# Altium PCB IC Power SimCom.PcbDoc (part 3 of 3)
Units mm, origin at the board's own origin, x right, y up, seen from the top; angles counter-clockwise.
Board outline 110 x 110 mm, 2 copper layers (Top Layer, Bottom Layer); 161 components, 109 nets, 599 pads, 845 vias.
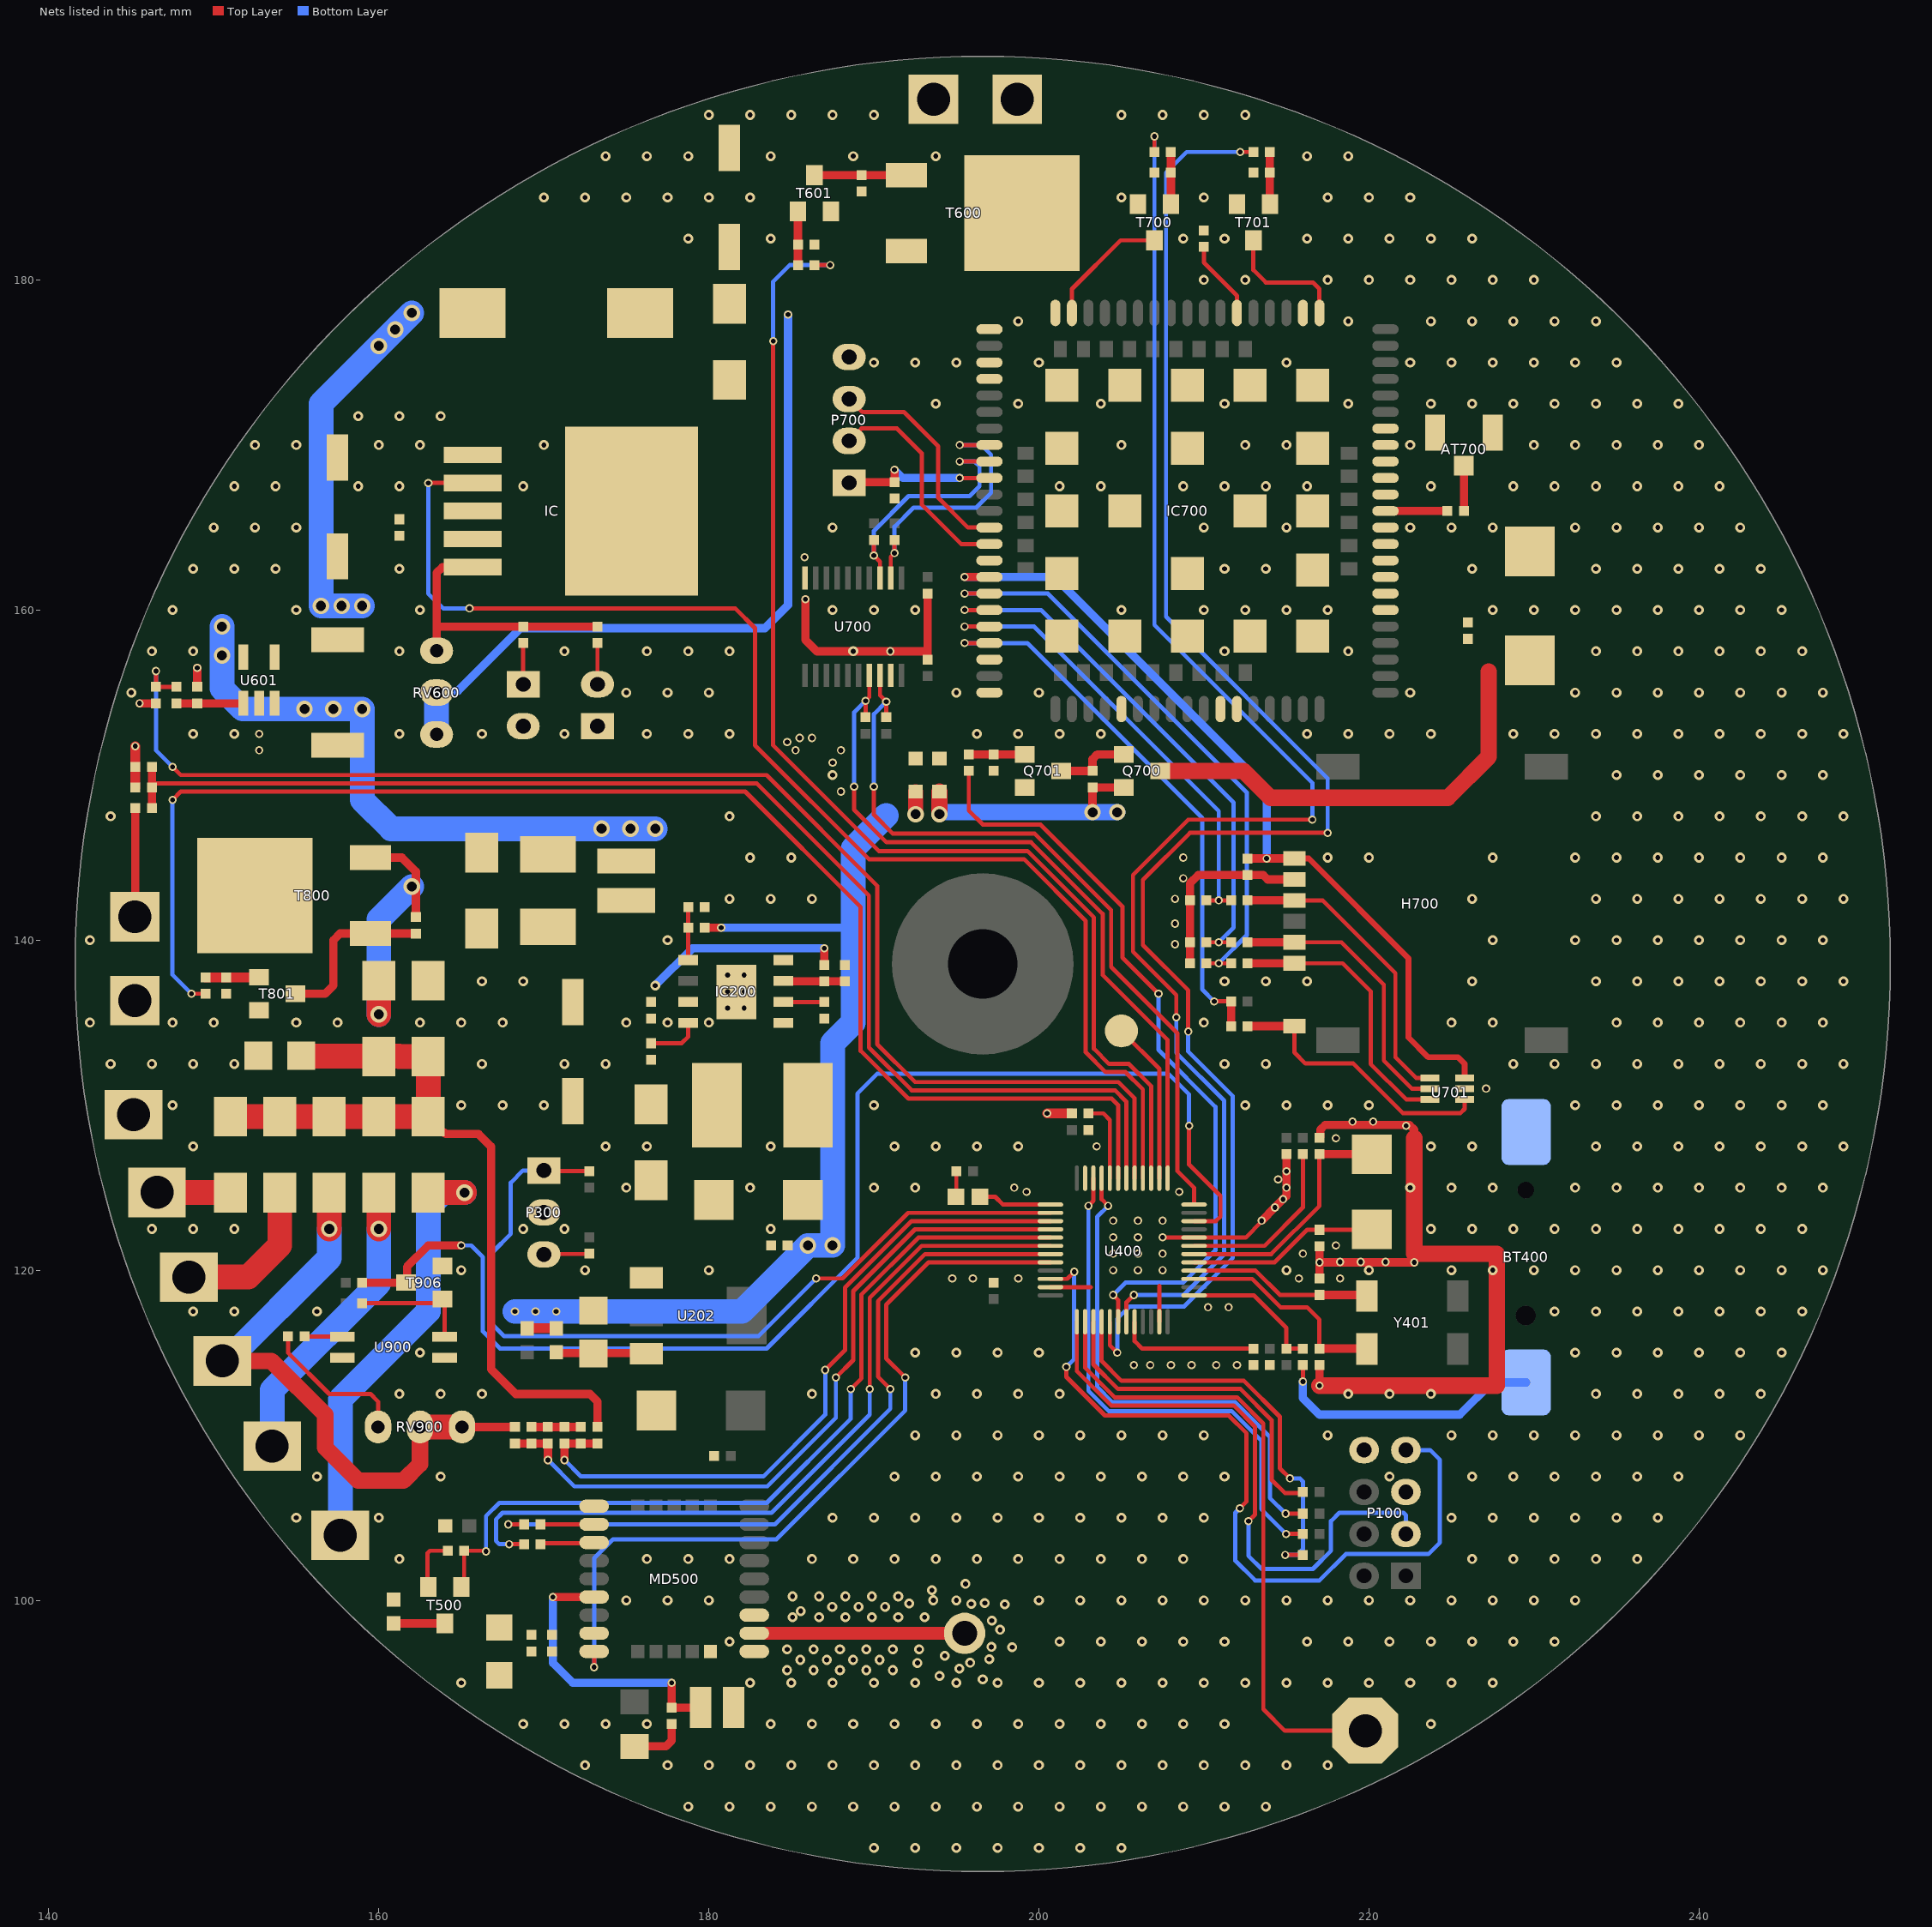
[diagram p2: the nets of this part, all layers, seen from the top]

## Via types
v1: diameter 0.6, hole 0.3, Top Layer to Bottom Layer, tented both sides, 654 vias
v2: diameter 0.5, hole 0.3, Top Layer to Bottom Layer, tented both sides, 164 vias
v3: diameter 1, hole 0.6, Top Layer to Bottom Layer, tented both sides, 27 vias

## Nets (pads, with @x,y where several pads share a name; then routed paths per layer and width w, separated by ;. In a path a pad name is that pad's centre, name@x,y a point inside that pad or via, vN(x,y) a via of type N, cw(c..) or ccw(c..) an arc to the next point about the centre after c; other vN are vias at no path point) (continued)
GND: BT400.2 C201.1 C202.1 C203.2 C204.2 C205.1 C208.1 C209.2 C400.1 C401.1 C402.1 C403.1 C404.1 C405.1 C406.1 C407.1 C500.1 C501.1 C502.2 C600.2 C601.1 C602.2 C603.1 C801.1 C802.2 C803.1 C900.1 C.2 D200.1 IC200.8 IC200.9 IC.1 L701.1 MD500.1 MD500.10 MD500.12 MD500.28 P100.5 P100.8 P300.2 P600.2 P601.1 P602.2 P800.2 R201.1 R203.1 R204.1 R400.1 R405.1 R605.1 R607.1 R803.1 R804.1 R806.1 R901.1 T601.2 T801.2 T905.1 T906.2 U202.1 U400.8 U400.23 U400.35 U400.47 U601.2 U900.2 U900.3 | length 72.1
  Top Layer w0.254: U400.35@200.7,118.975 203.15,118.975 ; U400.47@207.3,116.875 207.3,119.05 ; v2@207.4,121.975 U400.8@209.4,121.975 212.525,121.975 v2@213.5,122.95
  Top Layer w0.5: v2(145.5,154.35) C603.1@146.5,154.35 ; R607.1@149,155.35 v2(149,156.5) ; C900.1@169.25,110.5 C801.1@172.25,110.5 ; v2(213.5,123) v2(214.3,123.8) 215,124.5 v2(215,125) C402.1@215,127.025 ; v2(217,113) C403.1@217,114.25 ; C404.1@217,119.5 v2(217,120.475) ; C401.1@217,121.45 v2(217,120.475) ; C400.1@217,128.025 217.05,128.075 217.05,128.507 217.343,128.8 222.457,128.8 222.75,128.507 222.75,128 ; 222.75,121 v2(222.75,120.475) v2(217,120.475)
  Top Layer w0.6: R804.1@145.25,149.25 C803.1@145.25,150.5 v2(145.25,151.75) ; v2(200.5,129.5) R405.1@202,129.5
  Top Layer w1: v2(217,113) 227.75,113 227.75,121 222.75,121 222.75,128
  other v1: 190,85 192.5,85 195,85 197.5,85 200,85 202.5,85 205,85 178.75,87.5 181.25,87.5 183.75,87.5 186.25,87.5 188.75,87.5 191.25,87.5 193.75,87.5 196.25,87.5 198.75,87.5 201.25,87.5 203.75,87.5 206.25,87.5 208.75,87.5 211.25,87.5 213.75,87.5 172.5,90 177.5,90 180,90 182.5,90 185,90 187.5,90 190,90 192.5,90 195,90 197.5,90 200,90 202.5,90 205,90 207.5,90 210,90 212.5,90 215,90 217.5,90 168.75,92.5 171.25,92.5 173.75,92.5 176.25,92.5 183.75,92.5 186.25,92.5 188.75,92.5 191.25,92.5 193.75,92.5 196.25,92.5 198.75,92.5 201.25,92.5 203.75,92.5 206.25,92.5 208.75,92.5 211.25,92.5 223.75,92.5 165,95 182.5,95 185,95 187.5,95 190,95 192.5,95 195,95 197.5,95 200,95 202.5,95 205,95 207.5,95 210,95 212.5,95 215,95 217.5,95 220,95 222.5,95 225,95 227.5,95 196.596,95.204 193.976,95.416 184.745,95.766 186.345,95.766 187.945,95.766 189.545,95.766 191.145,95.766 195.178,95.861 192.64,96.204 195.84,96.214 185.545,96.39 187.145,96.39 188.745,96.39 190.345,96.39 196.991,96.433 194.297,96.636 184.745,97.027 186.345,97.027 187.945,97.027 189.545,97.027 191.145,97.027 192.745,97.027 198.383,97.154 197.122,97.172 181.25,97.5 201.25,97.5 203.75,97.5 206.25,97.5 208.75,97.5 211.25,97.5 216.25,97.5 218.75,97.5 221.25,97.5 223.75,97.5 226.25,97.5 228.75,97.5 231.25,97.5 197.652,98.216 197.145,98.772 185.078,98.973 186.678,98.973 188.278,98.973 189.878,98.973 191.478,98.973 193.078,98.973 185.564,99.345 187.478,99.61 189.078,99.61 190.678,99.61 197.937,99.753 195.9,99.778 192.14,99.806 196.724,99.837 175,100 177.5,100 180,100 193.601,100.001 195,100 200,100 202.5,100 205,100 207.5,100 210,100 212.5,100 215,100 217.5,100 220,100 222.5,100 225,100 227.5,100 230,100 232.5,100 185.078,100.234 186.678,100.234 188.278,100.234 189.878,100.234 191.478,100.234 193.516,100.613 195.554,100.991 161.25,102.5 176.25,102.5 178.75,102.5 181.25,102.5 186.25,102.5 188.75,102.5 191.25,102.5 193.75,102.5 196.25,102.5 198.75,102.5 201.25,102.5 203.75,102.5 206.25,102.5 208.75,102.5 226.25,102.5 228.75,102.5 231.25,102.5 233.75,102.5 236.25,102.5 155,105 160,105 187.5,105 190,105 192.5,105 195,105 197.5,105 200,105 202.5,105 205,105 207.5,105 210,105 225,105 227.5,105 230,105 232.5,105 235,105 237.5,105 156.25,107.5 163.75,107.5 191.25,107.5 193.75,107.5 196.25,107.5 198.75,107.5 201.25,107.5 203.75,107.5 206.25,107.5 208.75,107.5 211.25,107.5 221.25,107.5 226.25,107.5 228.75,107.5 231.25,107.5 233.75,107.5 236.25,107.5 238.75,107.5 192.5,110 195,110 197.5,110 200,110 202.5,110 205,110 207.5,110 210,110 217.5,110 225,110 227.5,110 230,110 232.5,110 235,110 237.5,110 240,110 242.5,110 161.25,112.5 163.75,112.5 166.25,112.5 186.25,112.5 193.75,112.5 196.25,112.5 198.75,112.5 201.25,112.5 218.75,112.5 221.25,112.5 223.75,112.5 233.75,112.5 236.25,112.5 238.75,112.5 241.25,112.5 243.75,112.5 162.5,115 192.5,115 195,115 197.5,115 200,115 232.5,115 235,115 237.5,115 240,115 242.5,115 245,115 148.75,117.5 151.25,117.5 156.25,117.5 231.25,117.5 233.75,117.5 236.25,117.5 238.75,117.5 241.25,117.5 243.75,117.5 246.25,117.5 165,120 172.5,120 180,120 215,120 220,120 225,120 227.5,120 230,120 232.5,120 235,120 237.5,120 240,120 242.5,120 245,120 247.5,120 146.25,122.5 148.75,122.5 151.25,122.5 168.75,122.5 171.25,122.5 183.75,122.5 223.75,122.5 226.25,122.5 228.75,122.5 231.25,122.5 233.75,122.5 236.25,122.5 238.75,122.5 241.25,122.5 243.75,122.5 246.25,122.5 175,125 182.5,125 190,125 192.5,125 222.5,125 225,125 227.5,125 232.5,125 235,125 237.5,125 240,125 242.5,125 245,125 247.5,125 148.75,127.5 173.75,127.5 176.25,127.5 183.75,127.5 191.25,127.5 193.75,127.5 196.25,127.5 198.75,127.5 223.75,127.5 226.25,127.5 233.75,127.5 236.25,127.5 238.75,127.5 241.25,127.5 243.75,127.5 246.25,127.5 248.75,127.5 147.5,130 165,130 167.5,130 170,130 190,130 143.75,132.5 146.25,132.5 148.75,132.5 151.25,132.5 166.25,132.5 171.25,132.5 173.75,132.5 142.5,135 147.5,135 150,135 155,135 157.5,135 162.5,135 165,135 167.5,135 175,135 177.5,135 180,135 166.25,137.5 168.75,137.5 142.5,140 177.5,140 181.25,142.5 183.75,142.5 186.25,142.5 182.5,145 185,145 143.75,147.5 181.25,147.5 187.5,150 148.75,152.5 151.25,152.5 161.25,152.5 166.25,152.5 171.25,152.5 176.25,152.5 178.75,152.5 181.25,152.5 145,155 175,155 177.5,155 180,155 146.25,157.5 148.75,157.5 161.25,157.5 171.25,157.5 176.25,157.5 178.75,157.5 181.25,157.5 147.5,160 155,160 162.5,160 148.75,162.5 151.25,162.5 153.75,162.5 161.25,162.5 150,165 152.5,165 155,165 151.25,167.5 153.75,167.5 158.75,167.5 161.25,167.5 168.75,167.5 152.5,170 155,170 160,170 162.5,170 170,170 158.75,171.75 161.25,171.75 163.75,171.75 178.75,182.5 183.75,182.5 170,185 172.5,185 175,185 177.5,185 180,185 182.5,185 173.75,187.5 176.25,187.5 178.75,187.5 183.75,187.5 188.75,187.5 193.75,187.5 180,190 182.5,190 185,190 187.5,190 190,190
  other v2: 205.75,114.25 206.75,114.25 208,114.25 209.25,114.25 210.75,114.25 212,114.25 210.25,117.75 211.5,117.75 194.75,119.5 196,119.5 198.75,119.5 215.75,119.5 218.25,119.5 204.5,120 206,120 207.5,120 218.25,120.5 219.5,120.5 221,120.5 204.5,121 206,121 207.5,121 216,121 218,121.5 204.5,122 206,122 207.5,122 204.5,123 206,123 207.5,123 214.8,124.3 199.25,124.75 208.5,124.75 198.5,125 214.5,125.5 215,126 203.5,127.5 218,128 222.25,128.75 219,129 220.25,129 181.133,135.885 182.133,135.885 181.133,136.885 182.133,136.885 181.133,137.885 182.133,137.885 188,149 187.5,150.75 152.75,151.5 185.25,151.5 188,151.5 184.75,152 185.5,152.25 186.25,152.25 152.75,152.5
GPS_PWR: L501.1 L502.2 R503.2 T500.2 | length 3.2
  Top Layer w0.254: T500.2@163,100.8 162.95,100.85 162.95,102.851 163.099,103 R503.2@164,103
GPS_VCC: C500.2 C501.2 C502.1 L501.2 MD500.8 T500.3 | length 3.1
  Top Layer w0.5: L501.2@160.9,98.6 T500.3@164,98.6
GSM.GND: AT700.2 C701.2 C702.2 C703.1 C704.1 C705.1 C706.1 C707.1 C708.1 C709.1 H700.5 IC700.2 IC700.17 IC700.18 IC700.29 IC700.39 IC700.45 IC700.46 IC700.54 IC700.58 IC700.59 IC700.61 IC700.62 IC700.63 IC700.64 IC700.65 IC700.69 IC700.70 IC700.71 IC700.72 IC700.73 IC700.74 IC700.75 IC700.76 IC700.77 IC700.78 IC700.79 IC700.80 IC700.81 IC700.82 IC700.83 IC700.84 IC700.85 IC700.86 IC700.87 IC700.88 IC700.89 IC700.91 IC700.92 IC700.94 L701.2 P700.4 Q701.2 R700.1 R707.2 R709.2 R711.2 T700.2 T701.2 U700.10 U700.19 U701.2 | length 25.7
  Top Layer w0.5: v2(185.85,160.65) 185.85,158.2 186.55,157.5 v2(191,157.5) 193.2,157.5 193.25,157.55 ; C705.1@193.25,157 193.25,157.55 ; C704.1@193.25,161 193.25,157.55 ; C709.1@209.15,138.597 C707.1@209.15,142.407 209.15,143.43 209.667,143.947 C706.1@212.65,143.947 213.591,143.947 213.861,143.677 H700.5@215.482,143.677
  other v1: 212.5,130 215,130 217.5,130 220,130 232.5,130 235,130 237.5,130 240,130 242.5,130 245,130 247.5,130 211.25,132.5 213.75,132.5 228.75,132.5 231.25,132.5 233.75,132.5 236.25,132.5 238.75,132.5 241.25,132.5 243.75,132.5 246.25,132.5 248.75,132.5 210,135 225,135 227.5,135 235,135 237.5,135 240,135 242.5,135 245,135 247.5,135 211.25,137.5 213.75,137.5 216.25,137.5 226.25,137.5 233.75,137.5 236.25,137.5 238.75,137.5 241.25,137.5 243.75,137.5 246.25,137.5 248.75,137.5 227.5,140 232.5,140 235,140 237.5,140 240,140 242.5,140 245,140 247.5,140 226.25,142.5 233.75,142.5 236.25,142.5 238.75,142.5 241.25,142.5 243.75,142.5 246.25,142.5 248.75,142.5 217.5,145 220,145 227.5,145 232.5,145 235,145 237.5,145 240,145 242.5,145 245,145 247.5,145 233.75,147.5 236.25,147.5 238.75,147.5 241.25,147.5 243.75,147.5 246.25,147.5 248.75,147.5 235,150 237.5,150 240,150 242.5,150 245,150 247.5,150 196.25,152.5 198.75,152.5 201.25,152.5 203.75,152.5 216.25,152.5 218.75,152.5 221.25,152.5 223.75,152.5 228.75,152.5 231.25,152.5 233.75,152.5 236.25,152.5 238.75,152.5 241.25,152.5 243.75,152.5 246.25,152.5 248.75,152.5 195,155 200,155 222.5,155 232.5,155 235,155 237.5,155 240,155 242.5,155 245,155 247.5,155 188.75,157.5 211.25,157.5 218.75,157.5 233.75,157.5 236.25,157.5 238.75,157.5 241.25,157.5 243.75,157.5 246.25,157.5 187.5,160 190,160 192.5,160 205,160 210,160 212.5,160 215,160 217.5,160 227.5,160 230,160 232.5,160 235,160 237.5,160 240,160 242.5,160 245,160 211.25,162.5 213.75,162.5 226.25,162.5 233.75,162.5 236.25,162.5 238.75,162.5 241.25,162.5 243.75,162.5 187.5,165 210,165 215,165 222.5,165 225,165 227.5,165 232.5,165 235,165 237.5,165 240,165 242.5,165 201.25,167.5 203.75,167.5 208.75,167.5 211.25,167.5 213.75,167.5 216.25,167.5 223.75,167.5 228.75,167.5 231.25,167.5 233.75,167.5 236.25,167.5 238.75,167.5 241.25,167.5 205,170 212.5,170 215,170 222.5,170 230,170 232.5,170 235,170 237.5,170 240,170 193.75,172.5 198.75,172.5 203.75,172.5 211.25,172.5 218.75,172.5 223.75,172.5 226.25,172.5 228.75,172.5 231.25,172.5 233.75,172.5 236.25,172.5 238.75,172.5 190,175 192.5,175 195,175 200,175 215,175 222.5,175 225,175 227.5,175 230,175 232.5,175 235,175 198.75,177.5 218.75,177.5 223.75,177.5 226.25,177.5 228.75,177.5 231.25,177.5 233.75,177.5 210,180 212.5,180 217.5,180 220,180 222.5,180 225,180 227.5,180 230,180 208.75,182.5 211.25,182.5 216.25,182.5 218.75,182.5 221.25,182.5 223.75,182.5 226.25,182.5 205,185 210,185 217.5,185 220,185 222.5,185 216.25,187.5 218.75,187.5 205,190 207.5,190 210,190 212.5,190
  other v2: 227.1,131 208.25,139.75 208.25,141 208.25,142.5 208.75,143.75 208.75,145 185.8,163.2
GSM.PWR: L700.2 Q700.2 R705.1 | length 15.4
  Top Layer w0.5: v3@203.25,148 R705.1@203.25,149.25 Q700.2@205.15,149.25
  Top Layer w1: v3(193.973,147.627) L700.2@193.973,149
  Bottom Layer w1: v3(193.973,147.627) 194.096,147.75 v3(204.75,147.75)
  other v3: 203.25,147.75
GSM.PWRKEY: IC700.1 T701.3 | length 7.7
  Top Layer w0.254: T701.3@213,182.4 213,180.6 213.75,179.85 216.6,179.85 217,179.45 IC700.1@217,178
GSM.RESET: IC700.16 T700.3 | length 7.7
  Top Layer w0.254: IC700.16@202,178 202,179.45 204.95,182.4 T700.3@207,182.4
GSM.VBAT: C702.1 C703.2 IC700.55 IC700.56 IC700.57 Q700.3 | length 26.8
  Top Layer w1: Q700.3@207.35,150.25 212.4,150.25 214.025,148.625 224.775,148.625 227.25,151.1 227.25,156.275
LED: D400.2 U400.25 | length 4.5
  Top Layer w0.254: D400.2@196.425,124.45 197.35,124.45 197.825,123.975 U400.25@200.7,123.975
LED_PWR: C600.1 D600.2 R602.2 RV600.2 RV600.3 T600.3 | length 43.6
  Bottom Layer w0.5: RV600.2@163.5,155 163.596,155.096 164.796,155.096 168.6,158.9 183.4,158.9 184.8,160.3 v2(184.8,177.9)
  Bottom Layer w1.5: RV600.3@163.5,152.46 RV600.2@163.5,155
LED_VCC: C601.2 C602.1 IC.4 L601.1 R603.2 U601.4 | length 22.5
  Bottom Layer w1.5: v3(159,160.25) v3(157.75,160.25) v3(156.5,160.25) 156.5,172.5 v3(162,178)
  other v3: 160,176 161,177
NetAT500_1: AT500.1 MD500.11 | length 12.8
  Top Layer w0.8: MD500.11@182.75,98 AT500.1@195.5,98
NetAT700_1: AT700.1 C700.1 | length 2.8
  Top Layer w0.5: C700.1@225.75,166 AT700.1@225.75,168.75
NetC200_1: C200.1 D200.2 IC200.5 L201.1
NetC200_2: C200.2 IC200.4 | length 3.2
  Top Layer w0.254: C200.2@176.5,133.75 178.35,133.75 178.75,134.15 IC200.4@178.75,134.98
NetC201_2: C201.2 L202.2 U202.3 | length 5.5
  Top Layer w0.5: L202.2@170.75,115.027 170.789,114.989 176.163,114.989 U202.3@176.202,114.95
NetC204_1: C204.1 C205.2 IC200.3 L200.2 R200.2 | length 12.2
  Top Layer w0.5: R200.2@187,138.5 v2(187,139.5)
  Bottom Layer w0.5: v1(176.75,137.25) 179,139.5 v2(187,139.5)
NetC503_1: C.1 MD500.6 R502.1 | length 17.4
  Top Layer w0.5: v2(170.55,100.2) MD500.6@173.05,100.2 ; v2(177.75,95) R502.1@177.75,93.5 C.1@179.5,93.5
  Bottom Layer w0.5: v2(170.55,100.2) 170.55,96.2 171.75,95 v2(177.75,95)
NetC603_2: C603.2 R606.2 U400.17 | length 85.5
  Top Layer w0.254: v2(146.5,156.3) C603.2@146.5,155.35 R606.2@147.75,155.35 ; v2(147.5,150.5) 148,150 183.5,150 190.2,143.3 190.2,133.7 192.5,131.4 204.821,131.4 205.8,130.421 U400.17@205.8,125.575
  Bottom Layer w0.254: v2(146.5,156.3) 146.5,151.5 v2(147.5,150.5)
NetC700_2: C700.2 IC700.60 | length 3.7
  Top Layer w0.5: IC700.60@221,166 C700.2@224.75,166
NetC801_2: C801.2 R800.1 R803.2 U400.27 | length 43.1
  Top Layer w0.254: v2(187.052,113.952) 188.25,115.15 188.25,118.943 192.282,122.975 U400.27@200.7,122.975
  Top Layer w0.5: v2(171.25,108.5) R803.2@171.25,109.5 R800.1@173.25,109.5
  Bottom Layer w0.254: v2(171.25,108.5) 172.25,107.5 183.3,107.5 187.052,111.252 v2(187.052,113.952)
NetC803_2: C803.2 R802.1 R804.2 U400.18 | length 79.6
  Top Layer w0.254: R804.2@146.25,149.5 182.9,149.5 189.7,142.7 189.7,133.493 192.293,130.9 204.614,130.9 205.3,130.214 U400.18@205.3,125.575
  Top Layer w0.5: R802.1@146.25,148 146.25,148.5 R804.2@146.25,149.25 146.25,149.5 C803.2@146.25,150.5
NetC900_2: C900.2 R900.1 R901.2 U400.28 | length 44.5
  Top Layer w0.254: v2(187.696,113.496) 188.75,114.55 188.75,118.736 192.489,122.475 U400.28@200.7,122.475
  Top Layer w0.5: R900.1@168.25,109.5 R901.2@170.25,109.5 v2(170.25,108.5)
  Bottom Layer w0.254: v2(170.25,108.5) 171.85,106.9 183.549,106.9 187.696,111.048 v2(187.696,113.496)
NetD400_1: D400.1 R404.2 | length 1.6
  Top Layer w0.254: D400.1@194.975,124.45 195,124.475 R404.2@195,126
NetD500_2: D500.2 R502.2 | length 3.4
  Top Layer w0.5: D500.2@175.5,91.15 177.4,91.15 177.75,91.5 R502.2@177.75,92.5
NetD600_1: D600.1 IC.3 IC.6 L601.2
NetD800_2: D800.2 R801.2 T800.3 | length 16.5
  Top Layer w0.5: T800.3@159.5,145 161.4,145 162.25,144.15 R801.2@162.25,141.4
  Top Layer w1.5: v3(160,135.5) D800.2@160,137.55
  Bottom Layer w1.5: v3(160,135.5) 160,141.25 v3(162,143.25)
NetD900_1: D900.1 T900.1 | length 4.4
  Top Layer w1.5: T900.1@146.558,124.714 146.565,124.707 150.993,124.707 D900.1@151,124.7
NetD902_1: D902.1 T901.1 | length 9.5
  Top Layer w1.5: T901.1@148.488,119.583 152.083,119.583 154,121.5 D902.1@154,124.7
NetD905_1: D905.1 T903.1 | length 18
  Top Layer w1.5: v3(160,122.5) D905.1@160,124.7
  Bottom Layer w1.5: T903.1@153.543,109.347 153.543,112.743 160,119.2 v3(160,122.5)
NetD906_1: D906.1 T904.1 | length 26.9
  Top Layer w1.5: D906.1@163,124.7 v3(165.2,124.7)
  Bottom Layer w1.5: T904.1@157.671,103.937 157.671,112.17 163,117.5 163,123.821 163.879,124.7 v3(165.2,124.7)
NetH700_2: H700.2 R712.2 U701.4 | length 18.5
  Top Layer w0.254: H700.2@215.482,142.407 217.193,142.407 221.6,138 221.6,132.9 222.85,131.65 U701.4@223.7,131.65
  Top Layer w0.5: R712.2@212.65,142.407 H700.2@215.482,142.407
NetH700_3: H700.3 R713.2 U701.5 | length 17.4
  Top Layer w0.254: H700.3@215.482,139.867 218.333,139.867 220.9,137.3 220.9,132.7 222.6,131 U701.5@223.7,131
  Top Layer w0.5: R713.2@212.65,139.867 H700.3@215.482,139.867
NetH700_7: H700.7 R715.2 U701.6 | length 17
  Top Layer w0.254: H700.7@215.482,138.597 218.403,138.597 220.1,136.9 220.1,132.5 222.25,130.35 U701.6@223.7,130.35
  Top Layer w0.5: R715.2@212.65,138.597 H700.7@215.482,138.597
NetH700_8: H700.8 R714.2 U701.1 | length 16.9
  Top Layer w0.254: H700.8@215.482,134.787 215.482,133.193 216.15,132.525 219.05,132.525 222.05,129.525 225.55,129.525 225.8,129.775 U701.1@225.8,130.35
  Top Layer w0.5: R714.2@212.65,134.787 H700.8@215.482,134.787
NetIC200_1: IC200.1 R202.1 R203.2 | length 3.2
  Top Layer w0.254: IC200.1@178.75,138.79 R203.2@178.75,142
NetIC200_6: IC200.6 R204.2 | length 2.5
  Top Layer w0.254: IC200.6@184.517,136.25 R204.2@187,136.25
NetIC200_7: IC200.7 R200.1 R201.2 | length 3.7
  Top Layer w0.5: IC200.7@184.517,137.52 184.527,137.51 188.24,137.51 R201.2@188.25,137.5
NetIC_2: IC.2 U400.16 | length 79.3
  Top Layer w0.254: v2(163,167.7) IC.2@165.685,167.7 ; v2(165.5,160.1) 181.6,160.1 182.8,158.9 182.8,151.8 189.7,144.9 199.1,144.9 202.833,141.167 202.833,134.374 202.833,134.167 202.833,133.21 204.043,132 205.25,132 206.3,130.95 U400.16@206.3,125.575
  Bottom Layer w0.254: v2(163,167.7) 163,161 163.9,160.1 v2(165.5,160.1)
NetIC_5: IC.5 R600.2 R601.2 RV600.1 | length 17.1
  Top Layer w0.5: RV600.1@163.5,157.54 163.5,159 ; IC.5@165.435,162.35 IC.5@165.685,162.6 163.85,162.6 163.5,162.25 163.5,159 ; R600.2@173.25,159 163.5,159
NetMD500_2: MD500.2 R500.1 | length 3.3
  Top Layer w0.254: R500.1@169.8,104.6 MD500.2@173.05,104.6
NetMD500_3: MD500.3 R501.1 | length 3.3
  Top Layer w0.254: R501.1@169.8,103.4 169.85,103.45 173,103.45 MD500.3@173.05,103.5
NetMD500_9: MD500.9 U400.32 | length 48
  Top Layer w0.254: v2(173.05,95.95) MD500.9@173.05,96.9 ; v2(191.9,113.496) 190.75,114.646 190.75,117.907 193.318,120.475 U400.32@200.7,120.475
  Bottom Layer w0.254: v2(173.05,95.95) 173.05,102.55 174.2,103.7 184.1,103.7 191.9,111.5 v2(191.9,113.496)
NetP100_3: P100.3 U400.37 | length 36.7
  Top Layer w0.254: U400.37@202.3,116.875 202.3,113.879 204.379,111.8 211.8,111.8 213.1,110.5 213.1,105.2 v2(212.7,104.8)
  Bottom Layer w0.254: v2(212.7,104.8) 212.7,102.7 213.5,101.9 216.6,101.9 217.7,103 217.7,104.8 218.2,105.3 222.091,105.3 222.24,105.151 P100.3@222.24,104.02
NetP100_7: P100.7 U400.34 | length 49.7
  Top Layer w0.254: U400.34@200.7,119.475 201.715,119.475 v2(202.14,119.9) ; v2(201.66,114.14) 201.66,113.54 204,111.2 211.5,111.2 212.58,110.12 212.58,105.98 v2(212.18,105.58)
  Bottom Layer w0.254: v2(201.66,114.14) 202.14,114.62 v2(202.14,119.9) ; v2(212.18,105.58) 211.9,105.3 211.9,102.4 213.1,101.2 217,101.2 218.6,102.8 223.6,102.8 224.3,103.5 224.3,108.5 223.7,109.1 P100.7@222.24,109.1
NetP300_1: P300.1 R300.1 U400.26 | length 51.3
  Top Layer w0.254: P300.1@170,126.04 170.04,126 R300.1@172.75,126 ; v2(186.5,119.5) 188.1,119.5 192.075,123.475 U400.26@200.7,123.475
  Bottom Layer w0.254: P300.1@170,126.04 168.74,126.04 168,125.3 168,122.2 166.9,121.1 166.9,116.7 167.6,116 183,116 v2(186.5,119.5)
NetP300_3: P300.3 R301.2 | length 2.8
  Top Layer w0.254: P300.3@170,120.96 170.02,120.98 172.73,120.98 R301.2@172.75,121
NetP600_1: P600.1 T600.2
NetP601_2: P601.2 R600.1 | length 2.5
  Top Layer w0.254: P601.2@173.25,155.5 R600.1@173.25,158
NetP602_1: P602.1 R601.1 | length 2.5
  Top Layer w0.254: P602.1@168.75,155.5 R601.1@168.75,158
NetQ700_1: Q700.1@205.15,151.25 Q701.3 R705.2 | length 4.6
  Top Layer w0.5: Q701.3@201.35,150.25 R705.2@203.25,150.25 203.25,150.957 203.543,151.25 Q700.1@205.15,151.25
NetQ701_1: Q701.1@199.15,151.25 R706.1 R707.1 | length 3.4
  Top Layer w0.5: R706.1@195.75,151.25 R707.1@197.25,151.25 Q701.1@199.15,151.25
NetR100_2: R100.2 U400.21 | length 30.9
  Top Layer w0.254: U400.21@203.8,125.575 203.8,124.3 v2(204.2,123.9) ; v2(214.95,105.25) R100.2@216,105.25
  Bottom Layer w0.254: v2(204.2,123.9) 203.531,123.231 203.531,112.92 204.451,112 211.9,112 214,109.9 214,106.2 v2(214.95,105.25)
NetR101_2: R101.2 U400.39 | length 20.6
  Top Layer w0.254: U400.39@203.3,116.875 203.3,114.293 204.793,112.8 212.214,112.8 214.1,110.914 214.1,107.3 214.9,106.5 R101.2@216,106.5
NetR102_2: R102.2 U400.22 | length 32
  Top Layer w0.254: v2(203,123.9) 203.3,124.2 U400.22@203.3,125.575 ; v2(214.98,104.02) R102.2@216,104.02
  Bottom Layer w0.254: v2(203,123.9) 203,112.7 204.231,111.469 211.68,111.469 213.469,109.68 213.469,105.531 v2(214.98,104.02)
NetR103_2: R103.2 U400.40 | length 25.8
  Top Layer w0.254: U400.40@203.8,116.875 203.8,114.5 205,113.3 212.421,113.3 214.6,111.121 214.6,108 v2(215.215,107.385) ; v2(214.93,102.75) R103.2@216,102.75
  Bottom Layer w0.254: v2(214.93,102.75) 215.65,102.75 216,103.1 216,107.2 215.815,107.385 v2(215.215,107.385)
NetR400_2: R400.2 U400.44 | length 8.6
  Top Layer w0.254: U400.44@205.8,116.875 205.8,115.7 206.25,115.25 R400.2@213,115.25
NetR401_1: R401.1 U400.7 | length 10.8
  Top Layer w0.254: U400.7@209.4,121.475 213.675,121.475 216,123.8 R401.1@216,127.025
NetR402_2: R402.2 R403.2 U400.1 | length 8.7
  Top Layer w0.254: U400.1@209.4,118.475 213.025,118.475 215,116.5 R403.2@215,115.25 R402.2@216,115.25
NetR405_2: R405.2 U400.20 | length 5
  Top Layer w0.254: R405.2@203,129.5 203.9,129.5 204.3,129.1 U400.20@204.3,125.575
NetR500_2: R500.2 U400.31 | length 45.5
  Top Layer w0.254: v2(167.85,104.6) R500.2@168.8,104.6 ; v2(191,112.8) 190.25,113.55 190.25,118.114 193.111,120.975 U400.31@200.7,120.975
  Bottom Layer w0.254: v2(167.85,104.6) 184,104.6 191,111.6 v2(191,112.8)
NetR501_2: R501.2 U400.30 | length 47.7
  Top Layer w0.254: v2(167.9,103.4) R501.2@168.8,103.4 ; v2(189.75,112.8) 189.75,118.322 192.903,121.475 U400.30@200.7,121.475
  Bottom Layer w0.254: v2(167.9,103.4) 167.3,103.4 167.1,103.6 167.1,104.9 167.5,105.3 183.8,105.3 189.75,111.25 v2(189.75,112.8)
NetR503_1: R503.1 T500.1@165,100.8 U400.29 | length 51
  Top Layer w0.254: T500.1@165,100.8 165.175,100.975 R503.1@165.175,103 v2@166.5,103 ; v2(188.6,112.8) 189.25,113.45 189.25,118.529 192.696,121.975 U400.29@200.7,121.975
  Bottom Layer w0.254: v2(166.5,102.962) 166.5,105.1 167.3,105.9 183.5,105.9 188.6,111 v2(188.6,112.8)
NetR602_1: R602.1 T600.1 T601.3 | length 5.6
  Top Layer w0.5: T601.3@186.4,186.35 T600.1@191.968,186.35
NetR604_1: R604.1 U400.15 | length 74.6
  Top Layer w0.254: v2(183.9,176.3) 183.9,151.8 190.3,145.4 199.307,145.4 203.333,141.374 203.333,133.417 204.25,132.5 205.457,132.5 206.8,131.157 U400.15@206.8,125.575 ; R604.1@186.4,180.9 v2(187.35,180.9)
  Bottom Layer w0.254: v2(183.9,176.3) 183.9,179.9 184.9,180.9 v2(187.35,180.9)
NetR604_2: R604.2 R605.2 T601.1@185.4,184.15 | length 3.3
  Top Layer w0.5: R604.2@185.4,180.9 R605.2@185.4,182.15 T601.1@185.4,184.15
NetR606_1: R606.1 R607.2 U601.1 | length 4
  Top Layer w0.5: R606.1@147.75,154.35 R607.2@149,154.35 U601.1@151.8,154.35
NetR703_1: R703.1 U400.12 U700.18 | length 46.6
  Top Layer w0.254: v2(190,149.3) 190,147.6 191.15,146.45 199.75,146.45 204.375,141.825 204.375,138.375 208.4,134.35 208.4,126 209.4,125 U400.12@209.4,123.975 ; U700.18@190.375,156.05 190.375,154.825 v2(190.75,154.45) R703.1@190.75,153.5
  Bottom Layer w0.254: v2(190,149.3) 190,153.7 v2(190.75,154.45)
NetR704_1: R704.1 U400.13 U700.17 | length 44.9
  Top Layer w0.254: v2(188.8,149.3) 188.8,147.9 190.77,145.93 199.527,145.93 203.864,141.594 203.864,137.886 207.8,133.95 U400.13@207.8,125.575 ; R704.1@189.5,153.5 v2(189.5,154.5) 189.725,154.725 U700.17@189.725,156.05
  Bottom Layer w0.254: v2(188.8,149.3) 188.8,153.8 v2(189.5,154.5)
NetR706_2: R706.2 U400.42 | length 46.4
  Top Layer w0.254: R706.2@195.75,150.25 195.75,147.85 196.6,147 200.1,147 205.067,142.033 205.067,138.933 v2(207.25,136.75) ; v2(204.5,118.5) 204.8,118.2 U400.42@204.8,116.875
  Bottom Layer w0.254: v2(204.5,118.5) 205.25,119.25 208.75,119.25 210.7,121.2 210.7,129.9 207.25,133.35 v2(207.25,136.75)
NetR708_1: R708.1 R709.1 T700.1@208,184.6 | length 3.1
  Top Layer w0.5: T700.1@208,184.6 R709.1@208,186.5 R708.1@208,187.75
NetR708_2: R708.2 U400.43 | length 92.2
  Top Layer w0.254: U400.43@205.3,116.875 205.3,118.05 v2(205.75,118.5) ; R708.2@207,187.75 v2(207,188.7) ; v2(208.325,135.325) 208.325,136.675 205.7,139.3 205.7,143.95 209.05,147.3 v2(216.569,147.3)
  Bottom Layer w0.254: v2(205.75,118.5) 208.775,118.5 211.225,120.95 211.225,130.275 208.325,133.175 v2(208.325,135.325) ; v2(207,188.7) 207,159.1 216.569,149.531 v2(216.569,147.3)
NetR710_1: R710.1 R711.1 T701.1@214,184.6 | length 3.1
  Top Layer w0.5: T701.1@214,184.6 R710.1@214,187.75
NetR710_2: R710.2 U400.41 | length 100.1
  Top Layer w0.254: U400.41@204.3,116.875 204.3,115.45 v2(204.75,115) ; v2(209.05,134.457) 209.05,136.95 206.3,139.7 206.3,143.65 209.15,146.5 v2(217.5,146.5) ; v2(212.193,187.75) R710.2@213,187.75
  Bottom Layer w0.254: v2(204.75,115) 204.75,117.05 205.5,117.8 208.8,117.8 211.75,120.75 211.75,130.55 209.05,133.25 v2(209.05,134.457) ; v2(212.193,187.75) 208.95,187.75 207.7,186.5 207.7,159.6 217.5,149.8 v2(217.5,146.5)
NetR801_1: R801.1 T800.1 T801.3 | length 10.4
  Top Layer w0.5: T801.3@154.95,136.75 156.75,136.75 157.25,137.25 157.25,140 157.65,140.4 T800.1@159.5,140.4 R801.1@162.25,140.4
NetR805_1: R805.1 U400.19 | length 88
  Top Layer w0.254: v2(147.5,148.5) 148,149 182.2,149 189.2,142 189.2,133.286 192.086,130.4 204.407,130.4 204.8,130.007 U400.19@204.8,125.575 ; v2(148.65,136.75) R805.1@149.5,136.75
  Bottom Layer w0.254: v2(147.5,148.5) 147.5,137.9 v2(148.65,136.75)
NetR805_2: R805.2 R806.2 T801.1@152.75,137.75 | length 3.3
  Top Layer w0.6: R805.2@149.5,137.75 R806.2@150.75,137.75 T801.1@152.75,137.75
NetR902_1: R902.1 T906.1@163.85,118.25 U900.4 | length 7.3
  Top Layer w0.254: R902.1@159,118 163.6,118 T906.1@163.85,118.25 163.996,118.104 U900.4@163.996,115.968
NetR903_1: R903.1 T906.3 U400.10 | length 79.9
  Top Layer w0.254: v2(209.1,128.75) 209.1,126.4 211,124.5 211,123.25 210.725,122.975 U400.10@209.4,122.975
  Top Layer w0.5: R903.1@159,119.25 T906.3@161.65,119.25 161.707,119.307 161.707,120.207 163,121.5 v2(165,121.5)
  Bottom Layer w0.254: v2(165,121.5) 165.6,121.5 166.3,120.8 166.3,116.3 167.35,115.25 183.5,115.25 189,120.75 189,130.7 190.2,131.9 207.85,131.9 209.1,130.65 v2(209.1,128.75)
NetR905_1: R905.1 U900.1 | length 2.3
  Top Layer w0.254: R905.1@155.5,116 155.516,115.984 157.78,115.984 U900.1@157.796,115.968
NetR905_2: R905.2 RV900.1 | length 9.2
  Top Layer w0.254: R905.2@154.5,116 154.5,115 157,112.5 159.5,112.5 159.96,112.04 RV900.1@159.96,110.5
NetT300_1: T300.1 U400.38 | length 39
  Top Layer w0.254: U400.38@202.8,116.875 202.8,114.086 204.586,112.3 212.007,112.3 213.6,110.707 213.6,93.4 214.9,92.1 T300.1@219.775,92.1
NetT400_1: T400.1 U400.14 | length 9.9
  Top Layer w0.254: T400.1@205,134.5 207.3,132.2 U400.14@207.3,125.575
OSC32I: C403.2 U400.3 Y401.1 | length 13.3
  Top Layer w0.254: U400.3@209.4,119.475 212.925,119.475 214.65,117.75 216.25,117.75 217,117 C403.2@217,115.25
  Top Layer w0.5: C403.2@217,115.25 219.85,115.25 Y401.1@219.875,115.225
OSC32O: C404.2 U400.4 Y401.4 | length 11.1
  Top Layer w0.254: U400.4@209.4,119.975 213.132,119.975 214.607,118.5 C404.2@217,118.5
  Top Layer w0.5: C404.2@217,118.5 219.8,118.5 Y401.4@219.875,118.425
OSCI: C401.2 U400.5 Y400.1 | length 11.6
  Top Layer w0.254: U400.5@209.4,120.475 214.282,120.475 216.257,122.45 C401.2@217,122.45 220.15,122.45 Y400.1@220.175,122.475
OSCO: C400.2 U400.6 Y400.2 | length 15.1
  Top Layer w0.254: U400.6@209.4,120.975 214.075,120.975 217,123.9 C400.2@217,127.025
  Top Layer w0.5: C400.2@217,127.025 Y400.2@220.175,127.025
SIM.CLK: C708.2 IC700.32 R713.1 | length 33
  Top Layer w0.254: v2(195.5,160) IC700.32@197,160 ; C708.2@210.15,139.867 v2(210.9,139.867) R713.1@211.65,139.867
  Bottom Layer w0.254: v2(195.5,160) 200.128,160 211.8,148.328 211.8,140.767 v2(210.9,139.867)
SIM.DATA: C709.2 IC700.31 R715.1 | length 36.1
  Top Layer w0.254: v2(195.5,161) IC700.31@197,161 ; C709.2@210.15,138.597 v2(210.9,138.597) R715.1@211.65,138.597
  Bottom Layer w0.254: v2(195.5,161) 200.543,161 212.6,148.943 212.6,140.297 v2(210.9,138.597)
SIM.DET: IC700.34 R714.1 R716.1 | length 34.2
  Top Layer w0.254: v2(195.5,158) IC700.34@197,158 ; v2(210.622,136.287) R716.1@211.65,136.287
  Top Layer w0.5: R714.1@211.65,134.787 R716.1@211.65,136.287
  Bottom Layer w0.254: v2(195.5,158) 199.3,158 209.9,147.4 209.9,137.009 v2(210.622,136.287)
SIM.RST: C707.2 IC700.33 R712.1 | length 28.4
  Top Layer w0.254: v2(195.5,159) IC700.33@197,159 ; C707.2@210.15,142.407 v2(210.9,142.407) R712.1@211.65,142.407
  Bottom Layer w0.254: v2(195.5,159) 199.714,159 210.9,147.814 v2(210.9,142.407)
SIM.VDD: C706.2 H700.1 IC700.30 U701.3 | length 51.3
  Top Layer w0.35: H700.1@215.482,144.947 216.353,144.947 222.4,138.9 222.4,134.1 223.6,132.9 225.4,132.9 225.8,132.5 U701.3@225.8,131.65
  Top Layer w0.5: v2(195.5,162) IC700.30@197,162 ; C706.2@212.65,144.947 H700.1@215.482,144.947
  Bottom Layer w0.5: v2(195.5,162) 200.957,162 213.8,149.157 v2(213.8,144.943)
SOLAR_TOP: D904.1 R900.2 RV900.2 RV900.3 T902.1 | length 37.6
  Top Layer w0.5: RV900.3@165.04,110.5 R900.2@168.25,110.5
  Top Layer w1: T902.1@150.52,114.503 153.497,114.503 156.75,111.25 156.75,109.25 158.75,107.25 161.5,107.25 162.5,108.25 RV900.2@162.5,110.5
  Top Layer w1.5: v3(157,122.5) D904.1@157,124.7 ; RV900.2@162.5,110.5 RV900.3@165.04,110.5
  Bottom Layer w1.5: T902.1@150.52,114.503 150.77,114.503 157,120.733 v3(157,122.5)
UART2_RX: IC700.22 R702.1 U700.2 | length 16.9
  Top Layer w0.254: U700.2@191.025,161.95 191.025,163.225 v2(191.25,163.45) R702.1@191.25,164.25 ; v2(195.2,170) IC700.22@197,170
  Bottom Layer w0.254: v2(191.25,163.45) 191.25,165.05 192.4,166.2 196.2,166.2 197.1,167.1 197.1,169.4 196.5,170 v2(195.2,170)
UART2_TX: IC700.23 R701.1 U700.3 | length 15.8
  Top Layer w0.254: R701.1@190,164.25 v2(190,163.3) 190.375,162.925 U700.3@190.375,161.95 ; v2(195.2,169) IC700.23@197,169
  Bottom Layer w0.254: v2(190,163.3) 190,164.8 192.1,166.9 195.8,166.9 196.4,167.5 196.4,168.7 196.1,169 v2(195.2,169)
USB.BOOT: IC700.6 R700.2 | length 4.8
  Top Layer w0.254: R700.2@210,182 210,181.05 212,179.05 IC700.6@212,178
USB.DN: IC700.28 P700.2 | length 13.5
  Top Layer w0.254: P700.2@188.5,170.25 189.25,171 191.4,171 192.9,169.5 192.9,166.386 195.286,164 IC700.28@197,164
USB.DP: IC700.27 P700.3 | length 13.6
  Top Layer w0.254: P700.3@188.5,172.79 189.29,172 191.814,172 193.9,169.914 193.9,166.8 195.7,165 IC700.27@197,165
USB.VBUS: C701.1 IC700.24 P700.1 | length 9.5
  Top Layer w0.254: v2(195.2,168) IC700.24@197,168
  Top Layer w0.5: P700.1@188.5,167.71 188.54,167.75 C701.1@191.25,167.75 v2(191.25,168.5)
  Bottom Layer w0.5: v2(191.25,168.5) 191.75,168 v2(195.2,168)
V_BAT: D903.1 P800.1 R802.2 T800.2 | length 6.6
  Top Layer w0.5: P800.1@145.225,141.415 145.25,141.44 R802.2@145.25,148
V_SOLAR: C802.1 D800.1 D900.2 D901.1 D902.2 D904.2 D905.2 D906.2 R800.2 | length 48.6
  Top Layer w0.5: D906.2@163,129.3 163,129.1 163.75,128.35 163.95,128.35 164.05,128.25 166.05,128.25 166.8,127.5 166.8,114 168.3,112.5 172.8,112.5 173.25,112.05 173.25,110.55 R800.2@173.25,110.5
  Top Layer w1.5: D900.2@151,129.3 D902.2@154,129.3 D904.2@157,129.3 D905.2@160,129.3 D906.2@163,129.3 D901.1@163,132.071 ; C802.1@155.3,133 155.325,132.975 161.225,132.975 161.25,132.95 D901.1@162.121,132.95
V_SYSTEM: D901.2 D903.2 F200.1
VBAT: BT400.1 R402.1 | length 16.7
  Top Layer w0.254: v2(216,113.25) R402.1@216,114.25
  Bottom Layer w0.5: v2(216,113.25) 216,112.25 217,111.25 225.5,111.25 227.45,113.2 BT400.1@229.525,113.2
VIN: F200.2 L200.1 R603.1 U601.3 U601.5 | length 36.7
  Bottom Layer w1.5: v3(150.5,159) v3(150.5,157.25) 150.5,155.25 151.75,154 v3(155.5,154) v3(157.25,154) v3(159,154) 159,148.5 160.75,146.75 v3(173.5,146.75) v3(175.25,146.75) v3(176.75,146.75)
VOUT: C202.2 C203.1 L201.2 L202.1 L203.1 L700.1 R202.2 | length 60.4
  Top Layer w0.5: R202.2@179.75,140.75 v2(180.75,140.75)
  Top Layer w0.6: L203.1@169,116.475 L202.1@170.75,116.475
  Top Layer w0.9: v3(192.525,147.627) L700.1@192.525,149
  Bottom Layer w0.5: v2(180.75,140.75) 188.75,140.75
  Bottom Layer w1.5: v2(168.25,117.5) v2(169.5,117.5) v2(170.75,117.5) 182,117.5 v3(186,121.5) v3(187.5,121.5) 187.5,133.75 188.75,135 188.75,140.75 188.75,145.55 190.75,147.55
pads on no net: BT400. H700.6 H700.MP IC200.2 IC700.3 IC700.4 IC700.5 IC700.7 IC700.8 IC700.9 IC700.10 IC700.11 IC700.12 IC700.13 IC700.14 IC700.19 IC700.20 IC700.21 IC700.25 IC700.26 IC700.35 IC700.36 IC700.37 IC700.38 IC700.40 IC700.41 IC700.42 IC700.43 IC700.44 IC700.47 IC700.48 IC700.49 IC700.50 IC700.51 IC700.52 IC700.53 IC700.66 IC700.67 IC700.68 IC700.90 IC700.93 IC700.95 IC700.96 IC700.97 IC700.98 IC700.99 IC700.100 IC700.101 IC700.102 IC700.103 IC700.104 IC700.105 IC700.106 IC700.107 IC700.108 IC700.109 IC700.110 IC700.111 IC700.112 IC700.113 IC700.114 IC700.115 IC700.116 IC700.117 IC700.118 IC700.119 IC700.120 IC700.121 IC700.122 IC700.123 IC700.124 IC700.125 IC700.126 IC700.127 IC700.128 IC700.129 IC700.130 MD500.4 MD500.5 MD500.7 MD500.13 MD500.14 MD500.15 MD500.16 MD500.17 MD500.18 MD500.19 MD500.20 MD500.21 MD500.22 MD500.23 MD500.24 MD500.25 MD500.26 MD500.27 P100.1 P100.2 Q700.1@206.25,151.266 Q701.1@200.25,151.266 T500.1@165.016,99.7 T601.1@185.384,185.25 T700.1@208.016,183.5 T701.1@214.016,183.5 T801.1@153.85,137.766 T906.1@162.75,118.234 U400.0 U400.2 U400.11 U400.33 U400.45 U400.46 U700.4 U700.5 U700.6 U700.7 U700.8 U700.9 U700.11 U700.12 U700.13 U700.14 U700.15 U700.16 U701.0 Y401.2 Y401.3

## Polygon pours and split planes (outlines as drawn)
GND on Top Layer "GND_L01_P002" (solid, remove dead copper, pour order 2): 254.5,129.25 254.5,83.5 141.5,83.5 141.5,193 203.5,193 203.5,180.25 185.25,180.25 185.25,152.5 193.5,152.5 193.5,146.5 207.75,146.5 207.75,129.25
GSM.GND on Top Layer "GSM.GND_L01_P001" (solid, remove dead copper, pour order 1): 254.25,152.935 254.25,129.525 207.75,129.525 207.75,146.5 193.5,146.5 193.5,152.935
GSM.GND on Top Layer "GSM.GND_L01_P000" (solid, remove dead copper, pour order 0): 200.5,193 200.5,180.25 185.25,180.25 185.25,152.5 193.5,152.5 193.5,149.437 253.25,149.437 253.25,193
GSM.GND on Bottom Layer "GSM.GND_L02_P004" (solid, remove dead copper, pour order 4): 203.5,193 203.5,180.5 184.25,180.5 184.25,152.5 193.5,152.5 193.5,146.5 207.75,146.5 207.75,129.25 254.5,129.25 254.5,193
GND on Bottom Layer "GND_L02_P003" (solid, remove dead copper, pour order 3): 203.5,193 141.5,193 141.5,83.5 254.5,83.5 254.5,129.25 207.75,129.25 207.75,146.5 193.5,146.5 193.5,152.5 184.25,152.5 184.25,180.5 203.5,180.5

## Keep-outs
Keep-Out Layer:
  circle w0.254: c196.596,138.557 r55

## Other copper
Top Layer:
  pour cut-out: 189.446,165.804 189.446,162.904 191.804,162.904 191.804,165.804
  pour cut-out: 193.859,152.5 193.5,152.5 193.5,156.554 193.859,156.554
  pour cut-out: 192.407,157.059 192.407,156.5 191.25,156.5 191.25,157.059
  pour cut-out: 193.5,154.25 192.5,154.25 192.5,152.25 193.5,152.25
  pour cut-out: 193.241,152.241 191,152.241 191,153 193.241,153
  region net GND: 185.329,152.5 184.288,152.5 184.288,152 186.25,152
  pour cut-out: 192.525,149.71 190.388,149.71 190.388,146.838 193.227,146.838 193.227,149.721
  pour cut-out: 184.288,152.25 187.85,152.25 187.85,152.5 184.288,152.5
  pour cut-out: 148.146,136.65 148.146,138.75 154.25,138.75 154.25,137.185 148.75,137.185 148.75,137.254
  pour cut-out: 154.096,135.996 154.096,145.864 160.866,145.864 160.866,135.996
  pour cut-out: 162.986,158.551 162.986,163.541 164.014,163.541 164.014,158.551
  pour cut-out: 158.8,116.522 152.524,116.522 152.524,113.932 155.143,113.932 155.143,115.414 158.8,115.414
  pour cut-out: 157.435,120.399 157.435,117.446 162.504,117.446 162.504,120.399
  pour cut-out: 165,115.414 165,119 162.504,119 162.504,115.414
  pour cut-out: 218.971,119.629 226.279,119.629 226.279,114.021 218.971,114.021
  pour cut-out: 221.629,128.479 221.629,121.021 218.721,121.021 218.721,128.479
  pour cut-out: 213.988,106.696 213.988,102.196 217.554,102.196 217.554,106.745 214.106,106.745
  pour cut-out: 202.752,128.946 204,128.946 204,129.75 202.752,129.75
  pour cut-out: 194.221,123.863 194.221,126.565 197.986,126.565 197.986,124.363
  pour cut-out: 188.804,138.054 187.554,138.054 187.554,136.885 188.804,136.885 188.804,136.946
  pour cut-out: 183.663,138.074 183.663,135.696 187.554,135.696 187.554,138.074 185.371,138.074
  pour cut-out: 167.689,168.454 162.496,168.454 162.496,165.059
  pour cut-out: 165.5,172.75 152.5,172.75 152.5,174.241 165.5,174.241
  pour cut-out: 165.5,174.241 154,174.241 154,183.5 165.5,183.5
  pour cut-out: 165.5,183.5 165.5,172.75 176,172.75 176,183.5
  pour cut-out: 151.246,153.836 147.125,153.836 147.125,154.904 149.554,154.904
  pour cut-out: 148.304,155.904 145.946,155.904 145.946,154.796 148.304,154.796
  region net GND: 153.141,154.864 153.141,155.225 152.354,155.225 152.354,154.864
  pour cut-out: 155.218,158.259 149.554,158.259 149.554,154.864 153.146,154.864 153.146,155.366
  pour cut-out: 159.884,156.65 159.884,150.25 153.146,150.25 153.146,156.65
  pour cut-out: 162.496,167.8 162.496,165 167.689,165 167.689,167.8
  pour cut-out: 164.014,159.514 164.014,165.216 170.941,165.216 170.941,159.514 165.266,159.514
  pour cut-out: 173.804,159.554 173.804,159.712 165.824,159.712 165.824,159.5 166.25,159.5
  pour cut-out: 192.685,155.25 190.5,155.25 190.5,153.065 192.685,153.065
  pour cut-out: 185.25,157.004 185.25,152.526 189.337,152.526 189.337,157.004
  pour cut-out: 185.204,152.25 182.75,152.25 182.75,177.041 184.991,177.041
  pour cut-out: 180.404,95.004 178.304,95.004 178.304,91.996 180.404,91.996
  pour cut-out: 172.024,105.154 163.743,105.154 163.743,98.659 172.024,98.659
  pour cut-out: 171.099,118.314 167.314,118.314 167.314,116.489 171.459,116.489
  pour cut-out: 180.766,116.489 167.314,116.489 167.314,114.065 180.766,114.065
  pour cut-out: 158.565,119.804 162.504,119.804 162.504,121.015 166.286,121.015 166.286,124.367 158.565,124.367
  pour cut-out: 164.254,126.154 148.562,126.154 148.562,122.96 164.254,122.96 164.254,125.713
  pour cut-out: 155.804,135.996 155.804,136.25 157.75,136.25 157.75,135.996
  pour cut-out: 157.764,139.787 157.764,134.509 161.901,134.509 161.901,139.886 157.863,139.886
  pour cut-out: 170.341,138.3 170.341,139 172.43,139 172.43,138.3
  pour cut-out: 179.604,135.738 179.604,133.359 178.679,133.359 178.679,135.738
  pour cut-out: 177.896,135.534 177.896,134.138 178.333,134.138 178.333,135.641 177.848,135.641
  pour cut-out: 179.304,139.344 179.304,135.534 179.604,135.534 179.604,139.344
  pour cut-out: 178.196,139.344 177.039,139.344 177.039,137.31 178.196,137.31
  pour cut-out: 178.196,142.554 178.196,136.839 179.304,136.839 179.304,142.554
  pour cut-out: 166.107,138.991 166.107,148.612 178.559,148.612 178.559,143.299 177.039,143.299 177.039,139 170.75,139
  pour cut-out: 222.75,132.5 222.75,129.5 226.75,129.5 226.75,132.5 223,132.5
  pour cut-out: 201.976,180.141 193.868,180.141 193.759,180.25
  pour cut-out: 193.5,149.729 195.362,149.729 195.362,149.437 193.5,149.437
  pour cut-out: 206.496,151.004 206.059,151.004 206.059,149.437 206.496,149.437
  pour cut-out: 206.004,152.004 202.204,152.004 202.204,149.437 206.004,149.437
  pour cut-out: 200.004,152.004 195.196,152.004 195.196,150.496 200.004,150.496
  region net GSM.GND: 200.496,148.5 196.138,148.5 196.138,149.696 200.496,149.696
  region net GSM.GND: 229.8,131.2 229.6,131 229.6,130.9 229.5,130.8 225.2,130.8 225.2,131.2
  region net NetP600_1: 195.4,187.7 196.3,188.6 196.3,192.3 196.9,192.9 200.6,192.9 201.1,192.4 201.1,189 202.5,187.6 202.5,180.5 202.4,180.4 195.5,180.4 195.4,180.5
  region net LED_PWR: 188.9,180.7 187.9,179.7 188.5,179.1 192.3,179.1 193.5,180.3 193.5,184.3 193.1,184.7 190.7,184.7 189.7,185.7 188.9,185.7
  region net LED_PWR: 180.2,183.1 180.7,183.6 182.6,183.6 182.9,183.3 182.9,180.5 183.4,180 189.6,180 190.4,180.8 190.4,182.6 190.7,182.9 193.5,182.9 193.5,177.9 192.9,177.3 180.2,177.3
  region net NetD600_1: 169.85,166.525 170.725,167.4 170.725,171.85 173.725,174.85 173.725,179.525 173.9,179.7 177.85,179.7 178.275,179.275 178.275,175.55 178.625,175.2 182.475,175.2 182.6,175.075 182.6,161.275 182.05,160.725 171.25,160.725 170.725,161.25 170.725,164.575 169.825,165.475 163.9,165.475 163.8,165.575 163.8,166.4 163.925,166.525
  region net LED_VCC: 164.85,179.575 162.025,179.575 159.4,176.95 159.4,174.95 159.85,174.5 167.125,174.5 167.825,175.2 167.825,179.375 167.6,179.6
  region net VIN: 168.6,144 177.7,144 178.3,144.6 178.3,147.7 178,148 168.5,148 168.3,147.8 168.3,144.3
  region net VIN: 150,156.3 149.7,156.6 149.7,159.7 150,160 152,160 152.2,159.8 152.2,156.5 152,156.3
  region net VIN: 153.4,150.975 153.6,150.775 159.2,150.775 159.575,151.15 159.575,155.025 159.475,155.125 153.4,155.125
  region net LED_VCC: 155.1,157.775 156.1,158.775 156.7,158.775 156.7,157.6 156.3,157.2
  region net LED_VCC: 159.35,156.375 159.625,156.65 159.625,157.575 159.2,158 153.4,158 153.325,157.925 153.325,156.45 153.4,156.375
  region net LED_VCC: 156.575,164.8 155.825,164.05 155.825,157.375 155.9,157.3 159.35,157.3 159.625,157.575 159.625,162.3 161.125,163.8 167.425,163.8 167.5,163.875 167.5,164.75 167.45,164.8
  region net GSM.GND: 190.85,158.025 191.2,158.375 191.2,155.3 191.175,155.275 190.9,155.275 190.85,155.325
  region net GSM.GND: 185.625,163.425 185.8,163.6 186,163.4 186,160.15 185.925,160.075 185.675,160.325 185.625,160.325
  region net GND: 152.45,151.15 152.65,150.95 153.05,151.35 153.05,155.125 152.95,155.225 152.55,155.225 152.45,155.125
  region net 3.3V: 207.675,116.15 207.85,115.975 213.55,115.975 213.7,115.825 213.7,114.95 214.3,114.95 214.3,116.525 213.775,117.05 208.275,117.05 207.925,117.4 207.925,117.575 207.85,117.65 207.75,117.65 207.675,117.575
  region net GND: 194.6,118.85 194.4,119.05 194.4,119.85 194.6,120.05 199.25,120.05 199.6,119.7 199.6,119.325 199.825,119.1 201.5,119.1 201.525,119.075 201.3,118.85 201.175,118.85
  region net 3.3V: 200.55,125.65 195.75,125.65 195.7,125.7 195.7,126.275 195.9,126.075 200.125,126.075
  region net 3.3V: 199.7,126.5 199.7,126.3 200,126 200.5,126
  region net GND: 202.675,128.8 202.75,128.875 203.825,128.875 203.95,128.75 203.95,126.95 203.8,126.8 203.25,126.8 202.925,126.475 202.925,124.875 202.825,124.775 202.775,124.775 202.675,124.875
  region net 3.3V: 202.425,128.75 202.25,128.925 200.05,128.925 199.7,128.575 199.7,126.5 200.55,125.65 201.75,125.65 202.175,125.225 202.175,124.8 202.225,124.75 202.375,124.75 202.425,124.8
  region net 3.3V: 196.55,118.6 196.325,118.375 196.325,116.725 196.525,116.525 198.825,116.525 199.1,116.8 200.65,118.35 201.425,118.35 201.475,118.4 201.475,118.55 201.425,118.6
  region net GSM.VBAT: 224.7,155.4 222.75,157.35 222.75,160.25 222.3,160.7 220.3,160.7 220.1,160.9 220.1,163.05 220.35,163.3 223.95,163.3 225.15,162.1 225.15,158.9 225.5,158.55 231.25,158.55 231.4,158.4 231.4,155.5 231.3,155.4
  region net GSM.PWR: 204.4,149.8 204.2,149.6 202.7,149.6 202.6,149.5 202.6,147.3 202.8,147.1 205.6,147.1 205.8,147.3 205.8,149.7 205.7,149.8
  region net 1.8V: 193.5,162.7 193.7,162.5 193.7,161.8 193.6,161.7 192.1,161.7 192,161.6 192,161.3 191.9,161.2 191.5,161.2 191.5,162.7
  region net 3.3V: 191.5,155 191.6,154.9 193.2,154.9 193.6,155.3 193.6,156.3 192.3,156.3 191.8,156.8 191.5,156.8
  region net VOUT: 169.225,116.025 167.775,116.025 167.7,116.1 167.7,117.9 167.875,118.075 171,118.075 171.2,117.875 171.2,116.075 171.125,116
  region net 3.3V: 181.025,108.175 181.1,108.1 183.175,108.1 183.525,108.45 183.525,118.975 183.4,119.1 181.15,119.1 181.025,118.975
  region net VOUT: 184.475,121.05 184.675,120.85 187.7,120.85 188,121.15 188,132.375 187.7,132.675 184.575,132.675 184.475,132.575
  region net GPS_VCC: 160.825,97.575 160.4,98 160.4,99.075 160.55,99.225 170.775,99.225 171.6,98.4 173.825,98.4 173.95,98.275 173.95,97.65 173.875,97.575
  region net NetD800_2: 160.25,145.75 162.25,145.75 162.75,145.25 162.75,141.3 162.55,141.1 161.425,141.1 161.125,141.4 161.125,143.325 160.75,143.7 158.475,143.7 158.1,144.075 158.1,145.65 158.225,145.775
  region net NetC204_1: 173.2,139.1 172.6,138.5 173.4,137.7 176.4,137.7 177.3,138.6 176.8,139.1 176.8,143.2 173.2,143.2
  region net NetC200_1: 183.4,132.5 182.5,131.6 182.5,127.7 182.1,127.3 180.6,127.3 179.5,128.4 180.5,129.4 180.3,132.5
  region net NetC200_1: 178.1,132.7 178.5,133.1 183,133.1 182.6,132.7 181,132.7
  region net NetC200_1: 175.4,132.5 176,133.1 182.2,133.1 183.9,134.8 183.9,135.3 184,135.4 185.2,135.4 185.3,135.3 185.3,134.4 183.4,132.5 182,132.5 182,127.3 179,127.3 178.8,127.5 178.8,128.3 178.3,128.8 175.5,128.8 175.4,128.9
  region net NetC204_1: 177.5,136.9 177.5,138.4 177.3,138.6 176,138.6 176,137.5 176.7,136.8
  region net NetC204_1: 173.6,135.9 172.4,134.7 170.8,134.7 170.6,134.9 170.6,138.3 170.9,138.6 176,138.6 178,136.6 179.4,136.6 179.5,136.5 179.5,136 179.4,135.9
  region net V_BAT: 167.5,148 167,148.5 149.5,148.5 147,146 148.5,144.5 155.5,144.5 157.25,146.25 163.75,146.25 164,146 164,144.25 164.25,144 167.25,144 167.5,144.25
  region net V_SYSTEM: 172,139.25 166,139.25 164.25,137.5 164.25,136.5 164,136.25 162,136.25 161.75,136.5 161.75,138.75 162,139 163.25,140.25 163.25,141.25 164,142 172,142 172.25,141.75 172.25,139.5
  region net V_BAT: 144,146.25 143.5,145.75 143.5,139.5 144,139 156,139 156.25,139.25 156.25,146 156,146.25
  region net V_SOLAR: 164,128 164.25,128.25 164.25,134 164,134.25 154.75,134.25 154.375,133.875 154.375,131.375 153.75,130.75 150,130.75 149.75,130.5 149.75,128.25 150,128
  region net GPS_PWR: 163.4,99.6 163.5,99.7 163.5,102.3 163.8,102.6 164.4,102.6 164.5,102.7 164.5,105 164.4,105.1 162.3,105.1 161.9,104.7 161.9,101.2 161.6,100.9 160.4,100.9 160.2,100.7 160.2,99.8 160.4,99.6
Bottom Layer:
  pour cut-out: 207.75,131.451 207.75,128.71 208.596,128.71 208.596,131.451
  region net VOUT: 190.8,146.75 192.6,146.75 193.05,147.2 193.05,149.3 192.85,149.5 191.1,149.5 190.8,149.2 190.8,148.65 190.05,147.9

## Silkscreen, mask and mechanical layers (free items; w line width, h text height)
Top Overlay:
  text "LED-" at 183.175,189.275 h3.2
  text "LED+" at 201.675,189.275 h3.2
  text "12V" at 169.701,147.144 h2.5 r90
  text "24V" at 174.277,147.144 h2.5 r90
  text "BAT+" at 143.35,144.45 h2
  text "BAT-" at 143.35,131.625 h2
  text "LED CTRL" at 200.587,131.044 h2
  text "TOP" at 150.625,116.1 h2
  text "ĐT: 02253759598 - 0913538298" at 244.25,114.5 h3.5 r90
  text "Số 2A/215 Lê Lai, Phường Ngô Quyền, TP Hải Phòng" at 239.75,104.75 h3 r90
  text "CTY CP THIẾT BỊ BÁO HIỆU HÀNG HẢI MIỀN BẮC" at 236.25,101.35 h3.5 r90